# Altium PCB Relay-Driver-Board-v1.0.PcbDoc (part 2 of 3)
Units mil, origin at the board's own origin, x right, y up, seen from the top; angles counter-clockwise.
Board outline 3472 x 3047 mil, 4 copper layers (Top Layer, POWER, GND, Bottom Layer), stack 62.449 mil thick; 86 components, 50 nets, 261 pads, 281 vias.
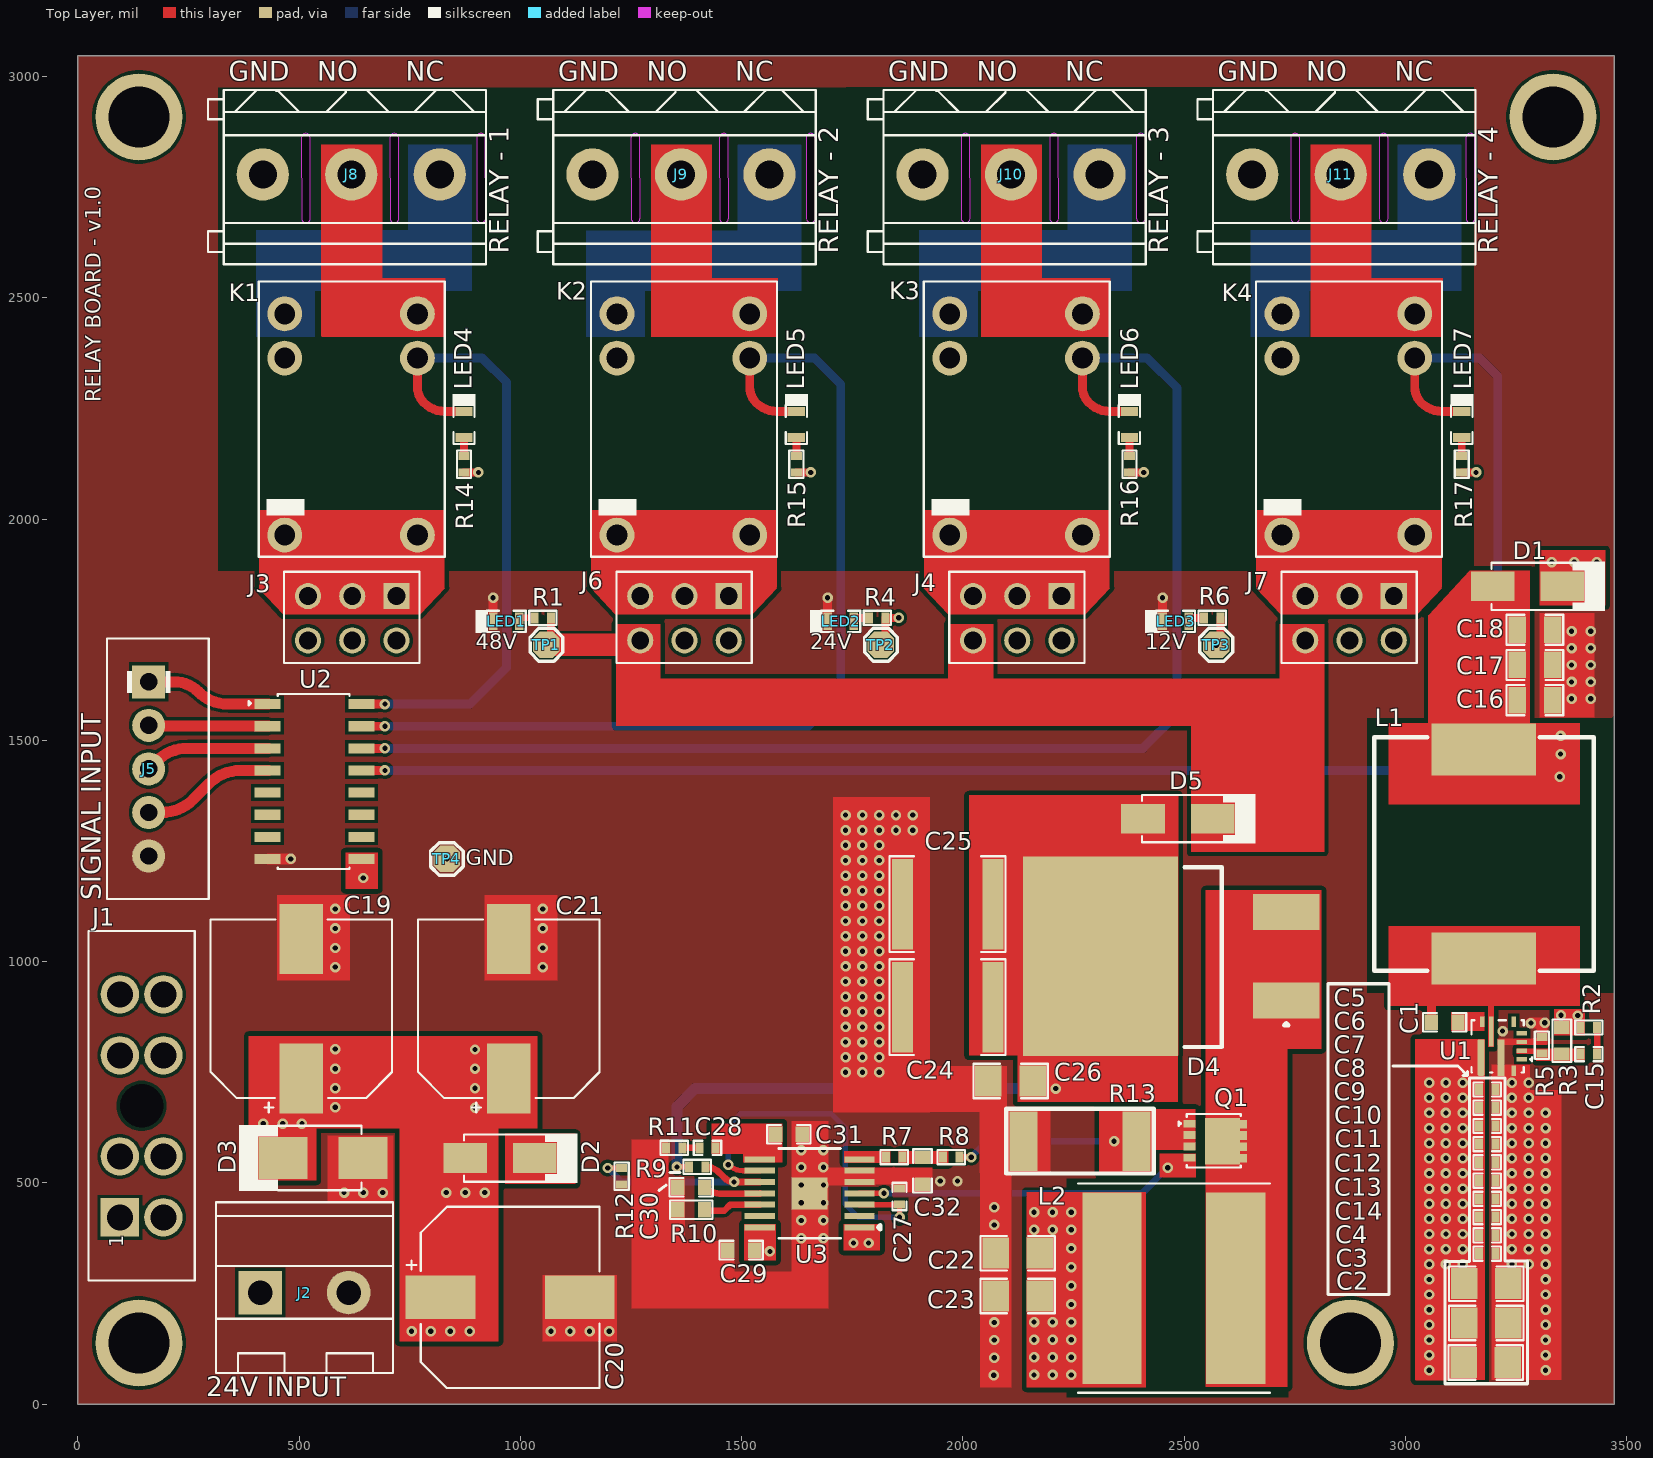
[diagram p0: Top Layer view]

## Part data (continued)
R3: library part RT0603BRE07196KL, "RES SMD 196K OHM 0.1% 1/10W 0603", Case/Package=0603, LCSC Part Number=C861716, Manufacturer=Yageo, Max Operating Temperature=155°C, Max Power Dissipation=100mW, Min Operating Temperature=-55°C, Temperature Coefficient=50ppm/°C, Tolerance=0.1%, Voltage Rating (DC)=50V, ComponentLink1Description=https://datasheet.ciiva.com/2584/pyu-rt-1-to-0-05-rohs-l-5-2584280.pdf?src-supplier=Digikey, ComponentLink1URL=https://datasheet.ciiva.com/2584/pyu-rt-1-to-0-05-rohs-l-5-2584280.pdf?src-supplier=Digikey, Item Type=Resistor, Lead Free="Lead Free", Manufacturer Part Number=RT0603BRE07196KL, Number of Terminations=2, Packaging="Tape and Reel", Pricing="5000=0.0414 (USD)", RoHS=Yes, RoHS Compliant=Yes, Series=RT, Stock=5000, Supplier="Arrow Electronics"
R4: library part RC0402FR-073K9L, "RES 3.9K OHM 1% 1/16W 0402", Case Code (Imperial)=0402, Case Code (Metric)=1005, LCSC Part Number=C131467, Manufacturer=Yageo, Max Operating Temperature=155°C, Max Power Dissipation=63mW, Min Operating Temperature=-55°C, Power Rating=62.5mW, Resistance Tolerance=1%, Resistor Type="Thick Film", Supplier Part Number=9808155, Temperature Coefficient=100ppm/°C, Voltage Rating=50V, Case/Package=0402, Category="Chip SMD Resistors", ComponentLink1Description=https://datasheet.ciiva.com/12666/pyu-rc0402-51-rohs-l-6-r-12666997.pdf?src-supplier=Mouser, ComponentLink1URL=https://datasheet.ciiva.com/12666/pyu-rc0402-51-rohs-l-6-r-12666997.pdf?src-supplier=Mouser, ComponentLink2Description=https://datasheet.ciiva.com/7849/1018594-7849989.pdf?src-supplier=Element14, ComponentLink2URL=https://datasheet.ciiva.com/7849/1018594-7849989.pdf?src-supplier=Element14, ComponentLink3Description=https://datasheet.ciiva.com/7849/1018594-7849990.pdf?src-supplier=Element14, ComponentLink3URL=https://datasheet.ciiva.com/7849/1018594-7849990.pdf?src-supplier=Element14, ComponentLink4Description=https://datasheet.ciiva.com/15189/getdatasheetpartid-469246-15189453.pdf?src-supplier=Verical, ComponentLink4URL=https://datasheet.ciiva.com/15189/getdatasheetpartid-469246-15189453.pdf?src-supplier=Verical, Construction=Rectangular, Depth=0.5mm, Features="Moisture Resistant", Item Type=Resistor, Lead Free="Lead Free", Length=1mm, Manufacturer Part Number=RC0402FR-073K9L, Military Standard=Not, Number of Terminations=2, Packaging="Tape and Reel", Pricing="10000=0.0011, 100000=0.0011, 300000=0.001, 750000=0.001, 2000000=0.0009 (USD)", Reach SVHC Compliant=Unknown, RoHS=Yes, RoHS Compliant=Yes, Series=RC, Stock=6910000, Supplier="Future Electronics", Termination=SMD/SMT, Tolerance=1%, Voltage Rating (AC)=50V
R5: library part RT0402BRD0710KL, "RES SMD 10K OHM 0.1% 1/16W 0402", LCSC Part Number=C190095, Manufacturer=Yageo, Supplier Part Number=1236728, Category="Chip SMD Resistors", ComponentLink1Description=https://datasheet.ciiva.com/12836/pyu-rt-1-to-0-05-rohs-l-4-12836454.pdf?src-supplier=Mouser, ComponentLink1URL=https://datasheet.ciiva.com/12836/pyu-rt-1-to-0-05-rohs-l-4-12836454.pdf?src-supplier=Mouser, Item Type=Resistor, Manufacturer Part Number=RT0402BRD0710KL, Pricing="10000=0.0218, 20000=0.0213, 30000=0.021, 50000=0.0206, 100000=0.0199 (USD)", RoHS=Yes, Stock=490000, Supplier="Future Electronics"
R6: library part RC0402FR-071K5L, "RES 1.5K OHM 1% 1/16W 0402", Case Code (Imperial)=0402, Case Code (Metric)=1005, LCSC Part Number=C114759, Manufacturer=Yageo, Max Operating Temperature=155°C, Max Power Dissipation=63mW, Min Operating Temperature=-55°C, Package Quantity=1, Power Rating=62.5mW, Resistance=1.5kR, Resistance Tolerance=1%, Resistor Type="Thick Film", Supplier Part Number 1=311-1.50KLRCT-ND, Temperature Coefficient=100ppm/°C, Voltage Rating=50V, Case/Package=0402, Category="Chip SMD Resistors", ComponentLink1Description=https://datasheet.ciiva.com/11808/0900766b80c66297-11808238.pdf?src-supplier=RSComponents, ComponentLink1URL=https://datasheet.ciiva.com/11808/0900766b80c66297-11808238.pdf?src-supplier=RSComponents, ComponentLink2Description=https://datasheet.ciiva.com/46394/1018594-46394950.pdf?src-supplier=Element14, ComponentLink2URL=https://datasheet.ciiva.com/46394/1018594-46394950.pdf?src-supplier=Element14, ComponentLink3Description=https://datasheet.ciiva.com/2453/pyu-r-int-thick-7-2453440.pdf?src-supplier=Digi-Key, ComponentLink3URL=https://datasheet.ciiva.com/2453/pyu-r-int-thick-7-2453440.pdf?src-supplier=Digi-Key, ComponentLink4Description=https://datasheet.ciiva.com/2453/pyu-r-int-thick-7-2453441.pdf?src-supplier=Digi-Key, ComponentLink4URL=https://datasheet.ciiva.com/2453/pyu-r-int-thick-7-2453441.pdf?src-supplier=Digi-Key, ComponentLink5Description=https://datasheet.ciiva.com/2453/pyu-r-int-thick-7-2453439.pdf?src-supplier=Digi-Key, ComponentLink5URL=https://datasheet.ciiva.com/2453/pyu-r-int-thick-7-2453439.pdf?src-supplier=Digi-Key, ComponentLink6Description=https://datasheet.ciiva.com/12558/pyu-rc0402-51-rohs-l-6-r-8721-12558542.pdf?src-supplier=Mouser, ComponentLink6URL=https://datasheet.ciiva.com/12558/pyu-rc0402-51-rohs-l-6-r-8721-12558542.pdf?src-supplier=Mouser, ComponentLink7Description=https://datasheet.ciiva.com/7849/1018594-7849863.pdf?src-supplier=Element14, ComponentLink7URL=https://datasheet.ciiva.com/7849/1018594-7849863.pdf?src-supplier=Element14, ComponentLink8Description=https://datasheet.ciiva.com/7849/1018594-7849864.pdf?src-supplier=Element14, ComponentLink8URL=https://datasheet.ciiva.com/7849/1018594-7849864.pdf?src-supplier=Element14, ComponentLink9Description=https://datasheet.ciiva.com/15189/getdatasheetpartid-323992-15189370.pdf?src-supplier=Verical, ComponentLink9URL=https://datasheet.ciiva.com/15189/getdatasheetpartid-323992-15189370.pdf?src-supplier=Verical, Construction=Rectangular, Depth=0.5mm, Features="Moisture Resistant", Height=0.016inch, Lead Free="Lead Free", Length=1mm, Manufacturer Part Number=RC0402FR-071K5L, Military Standard=Not, Number of Terminations=2, Packaging="Tape and Reel", Pricing 1="1=0.10000, 10=0.01500, 100=0.00610, 1000=0.00275, 2500=0.00239, 5000=0.00197 (USD)", REACH SVHC="No SVHC", RoHS=Yes, RoHS Compliant=Yes, Series=RC, Size Code=0402, Stock 1=2832947, Supplier 1=Digi-Key, Technology="THICK FILM", Termination=SMD/SMT, Tolerance=1%, Width=0.02inch
R7: library part AC0402FR-07511RL, "RES SMD 511 OHM 1% 1/16W 0402", Case Code (Imperial)=0402, Case Code (Metric)=1005, LCSC Part Number=C227124, Manufacturer=Yageo, Max Operating Temperature=155°C, Max Power Dissipation=63mW, Min Operating Temperature=-55°C, Power Rating=62.5mW, Temperature Coefficient=100ppm/°C, Tolerance=1%, Voltage Rating=50V, Case/Package=0402, ComponentLink1Description=http://www.mouser.com/ds/2/447/yageodocoutput-1111992.pdf?src-supplier=Mouser, ComponentLink1URL=http://www.mouser.com/ds/2/447/yageodocoutput-1111992.pdf?src-supplier=Mouser, ComponentLink2Description=http://www.yageo.com/NewPortal/yageodocoutput?fileName=/pdf/R-Chip/PYu-AC_51_RoHS_L_6.pdf&src-supplier=Digikey, ComponentLink2URL=http://www.yageo.com/NewPortal/yageodocoutput?fileName=/pdf/R-Chip/PYu-AC_51_RoHS_L_6.pdf&src-supplier=Digikey, Features="Moisture Resistant,Automotive AEC-Q200", Height=0.015inch, Item Type=Resistor, Length=0.039inch, Manufacturer Part Number=AC0402FR-07511RL, Number of Terminations=2, Packaging="Tape and Reel", Pricing="10000=0.00343 (USD)", RoHS=Yes, RoHS Compliant=Yes, Series=AC, Supplier=Digikey, Termination=SMD/SMT, Weight=2.3E-05oz, Width=0.5mm
R8: library part RC0402FR-07100RL, "RES 100 OHM 1% 1/16W 0402", Case Code (Imperial)=0402, Case Code (Metric)=1005, LCSC Part Number=C106232, Manufacturer=Yageo, Max Operating Temperature=155°C, Max Power Dissipation=63mW, Min Operating Temperature=-55°C, Power Rating=62.5mW, Resistance Tolerance=1%, Resistor Type="Thick Film", Supplier Part Number 1=603-RC0402FR-07100RL, Temperature Coefficient=100ppm/°C, Voltage Rating=50V, Case/Package=0402, Category="Chip SMD Resistors", ComponentLink1Description=https://datasheet.ciiva.com/11808/0900766b80c66297-11808765.pdf?src-supplier=RSComponents, ComponentLink1URL=https://datasheet.ciiva.com/11808/0900766b80c66297-11808765.pdf?src-supplier=RSComponents, ComponentLink2Description=https://datasheet.ciiva.com/7849/1784430-7849810.pdf?src-supplier=Element14, ComponentLink2URL=https://datasheet.ciiva.com/7849/1784430-7849810.pdf?src-supplier=Element14, ComponentLink3Description=https://datasheet.ciiva.com/28367/1018594-28367226.pdf?src-supplier=Element14, ComponentLink3URL=https://datasheet.ciiva.com/28367/1018594-28367226.pdf?src-supplier=Element14, ComponentLink4Description=https://datasheet.ciiva.com/22747/1018594-22747511.pdf?src-supplier=Element14, ComponentLink4URL=https://datasheet.ciiva.com/22747/1018594-22747511.pdf?src-supplier=Element14, ComponentLink5Description=https://datasheet.ciiva.com/12667/pyu-rc0402-51-rohs-l-6-r-12667957.pdf?src-supplier=Mouser, ComponentLink5URL=https://datasheet.ciiva.com/12667/pyu-rc0402-51-rohs-l-6-r-12667957.pdf?src-supplier=Mouser, ComponentLink6Description=https://datasheet.ciiva.com/15189/getdatasheetpartid-329466-15189335.pdf?src-supplier=Verical, ComponentLink6URL=https://datasheet.ciiva.com/15189/getdatasheetpartid-329466-15189335.pdf?src-supplier=Verical, ComponentLink7Description=https://datasheet.ciiva.com/16740/pyu-rc0402-51-rohs-l-6-r-16740566.pdf?src-supplier=Future+Electronics, ComponentLink7URL=https://datasheet.ciiva.com/16740/pyu-rc0402-51-rohs-l-6-r-16740566.pdf?src-supplier=Future+Electronics, Construction=Rectangular, Depth=0.5mm, Features="Moisture Resistant", Height=0.32mm, Item Type=Resistor, Lead Free="Lead Free", Length=1mm, Manufacturer Part Number=RC0402FR-07100RL, Military Standard=Not, Number of Pins=2, Number of Terminations=2, Packaging="Tape and Reel", Pricing 1="1=0.10000, 10=0.01200, 50=0.01200, 100=0.00500, 1000=0.00300, 2500=0.00200, 10000=0.00100 (USD)", REACH SVHC="No SVHC", Resistance=100R, RoHS=Yes, RoHS Compliant=Yes, Series=RC, Size Code=0402, Stock 1=699545, Supplier 1=Mouser, Technology="THICK FILM", Termination=SMD/SMT, Tolerance=1%, Voltage Rating (DC)=50V, Width=0.5mm
R9: library part RT0402BRD07120KL, "RES SMD 120K OHM 0.1% 1/16W 0402", LCSC Part Number=C852501, Manufacturer=Yageo, Supplier Part Number=4117142, Category="Chip SMD Resistors", ComponentLink1Description=https://datasheet.ciiva.com/12724/pyu-rt-1-to-0-05-rohs-l-4-12724453.pdf?src-supplier=Mouser, ComponentLink1URL=https://datasheet.ciiva.com/12724/pyu-rt-1-to-0-05-rohs-l-4-12724453.pdf?src-supplier=Mouser, Item Type=Resistor, Manufacturer Part Number=RT0402BRD07120KL, Pricing="10000=0.0243, 20000=0.0238, 40000=0.0232, 50000=0.023, 150000=0.022 (USD)", RoHS=Yes, Stock=10000, Supplier="Future Electronics"
R10: library part RC0603FR-0748K7L, "RES 48.7K OHM 1% 1/10W 0603", Manufacturer=Yageo, Supplier Part Number=49AK2108, Voltage Rating (DC)=50V, ComponentLink1Description=https://datasheet.ciiva.com/2454/pyu-r-int-thick-7-2454495.pdf?src-supplier=Digikey, ComponentLink1URL=https://datasheet.ciiva.com/2454/pyu-r-int-thick-7-2454495.pdf?src-supplier=Digikey, ComponentLink2Description=https://datasheet.ciiva.com/2454/pyu-r-int-thick-7-2454496.pdf?src-supplier=Digikey, ComponentLink2URL=https://datasheet.ciiva.com/2454/pyu-r-int-thick-7-2454496.pdf?src-supplier=Digikey, ComponentLink3Description=https://datasheet.ciiva.com/2454/pyu-r-int-thick-7-2454497.pdf?src-supplier=Digikey, ComponentLink3URL=https://datasheet.ciiva.com/2454/pyu-r-int-thick-7-2454497.pdf?src-supplier=Digikey, Item Type=Resistor, Lead Free=5697LeadFree, Manufacturer Part Number=RC0603FR-0748K7L, Pricing="1=0.104, 25=0.011, 50=0.009, 100=0.006 (USD)", RoHS=Yes, Stock=2423, Supplier=Avnet
R11: library part RT0402BRD072K94L, "RES SMD 2.94KOHM 0.1% 1/16W 0402", LCSC Part Number=C852709, Manufacturer=Yageo, ComponentLink1Description=https://datasheet.ciiva.com/2582/pyu-rt-1-to-0-05-rohs-l-5-2582298.pdf?src-supplier=Digikey, ComponentLink1URL=https://datasheet.ciiva.com/2582/pyu-rt-1-to-0-05-rohs-l-5-2582298.pdf?src-supplier=Digikey, Item Type=Resistor, Manufacturer Part Number=RT0402BRD072K94L, Pricing="1=0.17, 10=0.125, 50=0.099, 100=0.091, 1000=0.061, 10000=0.038 (USD)", RoHS=Yes, Stock=11202, Supplier=Mouser
R12: library part RC0402FR-072K49L, "RES 2.49K OHM 1% 1/16W 0402", Case Code (Imperial)=0402, Case Code (Metric)=1005, LCSC Part Number=C145071, Manufacturer=Yageo, Max Operating Temperature=155°C, Max Power Dissipation=63mW, Min Operating Temperature=-55°C, Package Quantity=1, Power Rating=62.5mW, Resistance Tolerance=1%, Resistor Type="Thick Film", Supplier Part Number=7635139, Temperature Coefficient=100ppm/°C, Voltage Rating=50V, Case/Package=0402, ComponentLink1Description=https://datasheet.ciiva.com/2518/pyu-r-int-thick-7-2518986.pdf?src-supplier=Digikey, ComponentLink1URL=https://datasheet.ciiva.com/2518/pyu-r-int-thick-7-2518986.pdf?src-supplier=Digikey, ComponentLink2Description=https://datasheet.ciiva.com/2518/pyu-r-int-thick-7-2518987.pdf?src-supplier=Digikey, ComponentLink2URL=https://datasheet.ciiva.com/2518/pyu-r-int-thick-7-2518987.pdf?src-supplier=Digikey, ComponentLink3Description=https://datasheet.ciiva.com/7983/1018594-7983516.pdf?src-supplier=Element14, ComponentLink3URL=https://datasheet.ciiva.com/7983/1018594-7983516.pdf?src-supplier=Element14, ComponentLink4Description=https://datasheet.ciiva.com/2518/pyu-r-int-thick-7-2518985.pdf?src-supplier=Digikey, ComponentLink4URL=https://datasheet.ciiva.com/2518/pyu-r-int-thick-7-2518985.pdf?src-supplier=Digikey, ComponentLink5Description=https://datasheet.ciiva.com/5558/pyu-rc0402-51-rohs-l-6-r-5558122.pdf?src-supplier=Mouser, ComponentLink5URL=https://datasheet.ciiva.com/5558/pyu-rc0402-51-rohs-l-6-r-5558122.pdf?src-supplier=Mouser, Contact Plating=Tin,Lead, Features="Moisture Resistant", Height=0.016inch, Item Type=Resistors, Lead Free="Lead Free", Length=0.039inch, Manufacturer Part Number=RC0402FR-072K49L, Number of Terminations=2, Packaging="Tape and Reel", Pricing="10000=0.0012, 100000=0.0011, 300000=0.001, 750000=0.001, 2000000=0.0009 (USD)", Reach SVHC Compliant=No, RoHS=Yes, RoHS Compliant=Yes, Series=RC, Stock=530000, Supplier="Future Electronics", Termination=SMD/SMT, Tolerance=1%, Voltage Rating (DC)=50V, Width=0.02inch
R13: library part PMR100HZPFU8L00, "RES 0.008 OHM 1% 2W 2512", Case Code (Imperial)=2512, Case Code (Metric)=6432, LCSC Part Number=C509729, Manufacturer=Rohm, Max Operating Temperature=155°C, Max Power Dissipation=2W, Min Operating Temperature=-55°C, Ratings=AEC-Q200, Temperature Coefficient=100ppm/°C, Tolerance=1%, Case/Package=2512, ComponentLink1Description=https://datasheet.ciiva.com/16477/pmr03ezp-16477837.pdf?src-supplier=Future+Electronics, ComponentLink1URL=https://datasheet.ciiva.com/16477/pmr03ezp-16477837.pdf?src-supplier=Future+Electronics, Features="Automotive AEC-Q200", Item Type=Resistor, Lead Free="Lead Free", Manufacturer Part Number=PMR100HZPFU8L00, Number of Terminations=2, Packaging="Cut Tape", Power Rating=2W, Pricing="1=0.36, 10=0.276, 50=0.276, 100=0.23, 1000=0.193, 10000=0.192 (USD)", RoHS=Yes, RoHS Compliant=Yes, Series=PMR, Stock=23905, Supplier=Mouser
R14 R15 R16 R17: library part RC0402FR-073K3L, "RES 3.3K OHM 1% 1/16W 0402", Case Code (Imperial)=0402, Case Code (Metric)=1005, LCSC Part Number=C137992, Manufacturer=Yageo, Max Operating Temperature=155°C, Max Power Dissipation=63mW, Min Operating Temperature=-55°C, Package Quantity=1, Power Rating=62.5mW, Resistance=3.3kR, Resistance Tolerance=1%, Resistor Type="Thick Film", Supplier Part Number 1=603-RC0402FR-073K3L, Temperature Coefficient=100ppm/°C, Voltage Rating=50V, Case/Package=0402, Category="Chip SMD Resistors", ComponentLink1Description=https://datasheet.ciiva.com/11808/0900766b80c66297-11808441.pdf?src-supplier=RSComponents, ComponentLink1URL=https://datasheet.ciiva.com/11808/0900766b80c66297-11808441.pdf?src-supplier=RSComponents, ComponentLink2Description=https://datasheet.ciiva.com/46394/1018594-46394940.pdf?src-supplier=Element14, ComponentLink2URL=https://datasheet.ciiva.com/46394/1018594-46394940.pdf?src-supplier=Element14, ComponentLink3Description=https://datasheet.ciiva.com/2453/pyu-r-int-thick-7-2453395.pdf?src-supplier=Digi-Key, ComponentLink3URL=https://datasheet.ciiva.com/2453/pyu-r-int-thick-7-2453395.pdf?src-supplier=Digi-Key, ComponentLink4Description=https://datasheet.ciiva.com/2453/pyu-r-int-thick-7-2453396.pdf?src-supplier=Digi-Key, ComponentLink4URL=https://datasheet.ciiva.com/2453/pyu-r-int-thick-7-2453396.pdf?src-supplier=Digi-Key, ComponentLink5Description=https://datasheet.ciiva.com/2453/pyu-r-int-thick-7-2453394.pdf?src-supplier=Digi-Key, ComponentLink5URL=https://datasheet.ciiva.com/2453/pyu-r-int-thick-7-2453394.pdf?src-supplier=Digi-Key, ComponentLink6Description=https://datasheet.ciiva.com/16746/pyu-rc0402-51-rohs-l-6-r-16746361.pdf?src-supplier=Future+Electronics, ComponentLink6URL=https://datasheet.ciiva.com/16746/pyu-rc0402-51-rohs-l-6-r-16746361.pdf?src-supplier=Future+Electronics, Construction=Rectangular, Depth=0.5mm, Features="Moisture Resistant", Height=0.016inch, Item Type=Resistor, Lead Free="Lead Free", Length=1mm, Manufacturer Part Number=RC0402FR-073K3L, Military Standard=Not, Number of Pins=2, Number of Terminations=2, Packaging="Tape and Reel", Pricing 1="1=0.10000, 10=0.01400, 50=0.01400, 100=0.00600, 1000=0.00300, 5000=0.00200, 10000=0.00100 (USD)", REACH SVHC="No SVHC", RoHS=Yes, RoHS Compliant=Yes, Series=RC, Size Code=0402, Stock 1=2413047, Supplier 1=Mouser, Technology="THICK FILM", Termination=SMD/SMT, Tolerance=1%, Voltage Rating (DC)=50V, Width=0.5mm
TP1 TP2 TP3 TP4: "Test Point ON", Item Type="TEST POINT"
U1: "IC REG BUCK ADJ 6A 10VQFN", Case/Package=VQFN, LCSC Part Number=C841386, Manufacturer="Texas Instruments", Max Operating Temperature=150°C, Max Output Voltage=13V, Max Supply Voltage=28V, Min Input Voltage=4.5V, Min Operating Temperature=-40°C, Min Output Voltage=600mV, Output Current=6A, Supplier Part Number=296-TPS56637RPARCT-ND, Switching Frequency=500kHz, Category="Voltage Regulators - Switching", ComponentLink1Description=http://www.ti.com/general/docs/suppproductinfo.tsp?distId=10&amp;gotoUrl=http%3A%2F%2Fwww.ti.com%2Flit%2Fgpn%2Ftps56637&src-supplier=Digikey, ComponentLink1URL=http://www.ti.com/general/docs/suppproductinfo.tsp?distId=10&amp;gotoUrl=http%3A%2F%2Fwww.ti.com%2Flit%2Fgpn%2Ftps56637&src-supplier=Digikey, Item Type=IC, Manufacturer Part Number=TPS56637RPAR, Mounting Technology="Surface Mount", Number of Outputs=1, Output Configuration=Positive, Output Type=Adjustable, Pins=10, Pricing="1=3.71, 10=3.332, 25=3.1496, 100=2.7297, 250=2.58976, 500=2.32376, 1000=1.9598 (USD)", RoHS=Yes, Series=-, Stock=17824, Supplier=Digikey, Synchronous Rectifier=Yes
U2: "IC PWR RELAY 7NPN 1:1 16SOIC", Manufacturer="Texas Instruments", Supplier Part Number=595-ULN2003AIDR, ComponentLink1Description=https://datasheet.ciiva.com/15139/getdatasheetpartid-47948-15139878.pdf?src-supplier=Verical, ComponentLink1URL=https://datasheet.ciiva.com/15139/getdatasheetpartid-47948-15139878.pdf?src-supplier=Verical, ComponentLink2Description=https://datasheet.ciiva.com/14424/ulq2003a-14424030.pdf?src-supplier=Avnet, ComponentLink2URL=https://datasheet.ciiva.com/14424/ulq2003a-14424030.pdf?src-supplier=Avnet, ComponentLink3Description=https://datasheet.ciiva.com/1700/uln2003ai-1700820.pdf?src-supplier=Digikey, ComponentLink3URL=https://datasheet.ciiva.com/1700/uln2003ai-1700820.pdf?src-supplier=Digikey, ComponentLink4Description=https://datasheet.ciiva.com/1700/uln2003ai-1700821.pdf?src-supplier=Digikey, ComponentLink4URL=https://datasheet.ciiva.com/1700/uln2003ai-1700821.pdf?src-supplier=Digikey, ComponentLink5Description=https://datasheet.ciiva.com/1700/uln2003ai-1700822.pdf?src-supplier=Digikey, ComponentLink5URL=https://datasheet.ciiva.com/1700/uln2003ai-1700822.pdf?src-supplier=Digikey, Item Type=IC, Manufacturer Part Number=ULN2003AIDR, Pricing="1=0.66, 10=0.589, 50=0.589, 100=0.402, 1000=0.285, 10000=0.232 (USD)", RoHS=Yes, Stock=2012, Supplier=Mouser
U3: "2.2MHZ WIDE INPUT NONSYNCHRONOUS", LCSC Part Number=C2867852, Manufacturer="Texas Instruments", Item Type=IC, Manufacturer Part Number=LM5156HPWPR, Pricing="1=2.18, 10=1.954, 25=1.8432, 100=1.5704, 250=1.4746, 500=1.29028, 1000=1.06908 (USD)", RoHS=No, Stock=2799, Supplier=Digikey

## Free pads (board coordinates)
  round 196.85 hole 137.8 unplated: " "(138,2909) " "(3334,2909) ""(138,138) ""(2876,138)

## Via types
v1: diameter 23.62, hole 11.81, Top Layer to Bottom Layer, 277 vias
v2: diameter 24, hole 12, Top Layer to Bottom Layer, 4 vias

## Nets (pads, with @x,y where several pads share a name; then routed paths per layer and width w, separated by ;. In a path a pad name is that pad's centre, name@x,y a point inside that pad or via, vN(x,y) a via of type N, cw(c..) or ccw(c..) an arc to the next point about the centre after c; other vN are vias at no path point)
+12V: D1.1 J3.2 J4.2 J6.2 J7.2 R6.1 TP3.1 | length 51.5
  Top Layer w18: TP3.1@2582.5,1726.5 R6.1@2582.5,1777
  Top Layer w50: v1(2573,1715) TP3.1@2573,1716
  other v1: 3433,1825 3433,1864 3331,1903 3382,1903 3433,1903
+24V: C2.2 C3.2 C4.2 C5.2 C6.2 C7.2 C8.2 C9.2 C10.2 C11.2 C12.2 C13.2 C14.2 C22.2 C23.2 C29.1 D2.1 J3.4 J4.4 J6.4 J7.4 K1.2 K2.2 K3.2 K4.2 L2.1 R4.1 R14.1 R15.1 R16.1 R17.1 TP2.1 U1.8 U2.9 U3.1 U3.14 | length 265.1
  Top Layer w18: R14.1@872.67,2105.5 v1(905.15,2105.5) ; C29.1@1526,358.5 1527.48,357.02 C29.1@1535,357.02 ; R15.1@1623.67,2105.5 v1(1656.15,2105.5) ; TP2.1@1825.5,1726.5 R4.1@1825.5,1777 v1(1854.99,1777) ; R16.1@2376.67,2105.5 v1(2409.15,2105.5) ; R17.1@3127.67,2105.5 v1(3160.15,2105.5)
  Top Layer w25: U2.9@638.94,1232 638.94,1195.06 v1(645,1189)
  other v1: 2161,65.8 2203,65.8 2245,65.8 3054,76.6 2161,105.67 2203,105.67 2245,105.67 3054,110.8 3054,145 2161,145.53 2203,145.53 2245,145.53 3054,179.2 2161,185.4 2203,185.4 2245,185.4 3054,213.4 2245,225.27 3054,247.6 2245,267.42 3054,281.8 2245,309.57 3054,316 3092,316 3130,316 1564,345 3054,350.2 3092,350.2 3130,350.2 2245,351.72 1753,364 1787,364 3054,384.4 3092,384.4 3130,384.4 2161,393.87 2203,393.87 2245,393.87 3054,418.6 3092,418.6 3130,418.6 2161,433.33 2203,433.73 2245,433.73 3054,452.8 3092,452.8 3130,452.8 3054,487 3092,487 3130,487 1109,518 3054,521.2 3092,521.2 3130,521.2 1109,554 3054,555.4 3092,555.4 3130,555.4 1109,590 3054,589.6 3092,589.6 3130,589.6 3054,623.8 3092,623.8 3130,623.8 3054,658 3092,658 3130,658 3054,692.2 3092,692.2 3130,692.2 3054,726.4 3092,726.4 3130,726.4
+48V: D5.1 J3.6 J4.6 J6.6 J7.6 R1.1 TP1.1 | length 281.1
  Top Layer w18: TP1.1@1059,1716 1069.5,1726.5 R1.1@1069.5,1777
  Top Layer w50: TP1.1@1059.36,1716 1258.55,1716 1268.55,1726 J6.6@1271,1726
  other v1: 2641,1285.02 2641,1320.02 2641,1355.02
GND: C2.1 C3.1 C4.1 C5.1 C6.1 C7.1 C8.1 C9.1 C10.1 C11.1 C12.1 C13.1 C14.1 C16.1 C17.1 C18.1 C19.2 C20.2 C21.2 C22.1 C23.1 C24.1 C25.1 C26.1 C27.1 C29.2 C30.2 C31.2 C32.1 D3.1 J2.2 J5.5 J8.3 J9.3 J10.3 J11.3 LED1.2 LED2.2 LED3.2 R5.1 R10.1 R11.1 R12.1 R13.1 TP4.1 U1.3 U1.9 U1.10 U2.8 U3.5 U3.6 U3.15 | length 595.8
  Top Layer w10: U1.9@3216.83,782.94 3216.83,815.5 U1.9@3219.71,818.38
  Top Layer w20: LED1.2@938.47,1769 v1(938.47,1822.47) ; LED2.2@1694.47,1769 v1(1694.47,1822.47) ; LED3.2@2451.47,1769 v1(2451.47,1822.47)
  Top Layer w25: U2.8@431.06,1232 v1(481,1232) ; R10.1@1356,440.02 C30.2@1356,490.02 ; C24.1@1850.28,897.02 C25.1@1850.28,1130.02 ; v1(3284,861) 3314.4,861 v1(3315,861.6) 3309,855.6 R5.1@3309,829.5
  other v1: 2070,65 3317,76.6 2071,104.87 3317,110.8 2071,144.73 3317,145 1069.08,164.55 1112.28,164.55 1156.48,164.55 1200.68,164.55 3317,179.2 2071,184.6 3317,213.4 3317,247.6 3317,281.8 3241,316 3279,316 3317,316 3241,350.2 3279,350.2 3317,350.2 1635,375 1685,375 3241,384.4 3279,384.4 3317,384.4 2071,404.87 1635,415 1685,415 3241,418.6 3279,418.6 3317,418.6 2071,444.73 3241,452.8 3279,452.8 3317,452.8 601.6,478 644.8,478 689,478 3241,487 3279,487 3317,487 1949,504 1988,504 3241,521.2 3279,521.2 3317,521.2 1635,535 1685,535 3241,555.4 3279,555.4 3317,555.4 1635,574.06 1685,574.06 3241,589.6 3279,589.6 3317,589.6 3241,623.8 3279,623.8 3317,623.8 3241,658 3279,658 3317,658 3241,692.2 3279,692.2 3241,726.4 3279,726.4 1735,749.8 1773,749.8 1811,749.8 1735,784 1773,784 1811,784 1735,818.2 1773,818.2 1811,818.2 3220,843 1735,852.4 1773,852.4 1811,852.4 1735,886.6 1773,886.6 1811,886.6 1735,920.8 1773,920.8 1811,920.8 1735,955 1773,955 1811,955 581.45,987.56 1050.45,987.56 1735,989.2 1773,989.2 1811,989.2 1735,1023.4 1773,1023.4 1811,1023.4 581.45,1030.76 1050.45,1030.76 1735,1057.6 1773,1057.6 1811,1057.6 581.45,1074.96 1050.45,1074.96 1735,1091.8 1773,1091.8 1811,1091.8 581.45,1119.16 1050.45,1119.16 1735,1126 1773,1126 1811,1126 1735,1160.2 1773,1160.2 1811,1160.2 1735,1194.4 1773,1194.4 1811,1194.4 1735,1228.6 1773,1228.6 1811,1228.6 834,1232 1735,1262.8 1773,1262.8 1811,1262.8 1735,1297 1773,1297 1811,1297 1849,1297 1887,1297 1735,1331.2 1773,1331.2 1811,1331.2 1849,1331.2 1887,1331.2 3376,1594 3419,1594 3376,1632.2 3419,1632.2 3376,1670.4 3419,1670.4 3376,1708.6 3419,1708.6 3376,1746.8 3419,1746.8
  other v2: 1635,455 1685,455 1635,495 1685,495